# Altium PCB MainBoardPCB_5.PcbDoc (part 12 of 35)
Units mm, origin at the board's own origin, x right, y up, seen from the top; angles counter-clockwise.
Board outline 258.95 x 308.86 mm, 16 copper layers (L1, L2 (GND), L3 (Sign), L4 (GND), L5 (Sign), L6 (PWR/GND), L7(PWR/GND), L8 (Plane_GND), L9 (PWR/GND), L10 (PWR/GND), L11 (PWR/GND), L12 (Sign), L13 (GND), L14 (Sign), L15 (GND), L16), stack 2.502 mm thick; 2361 components, 1769 nets, 8410 pads, 3285 vias.
Unrouted connection lines stored in the file: 4635.
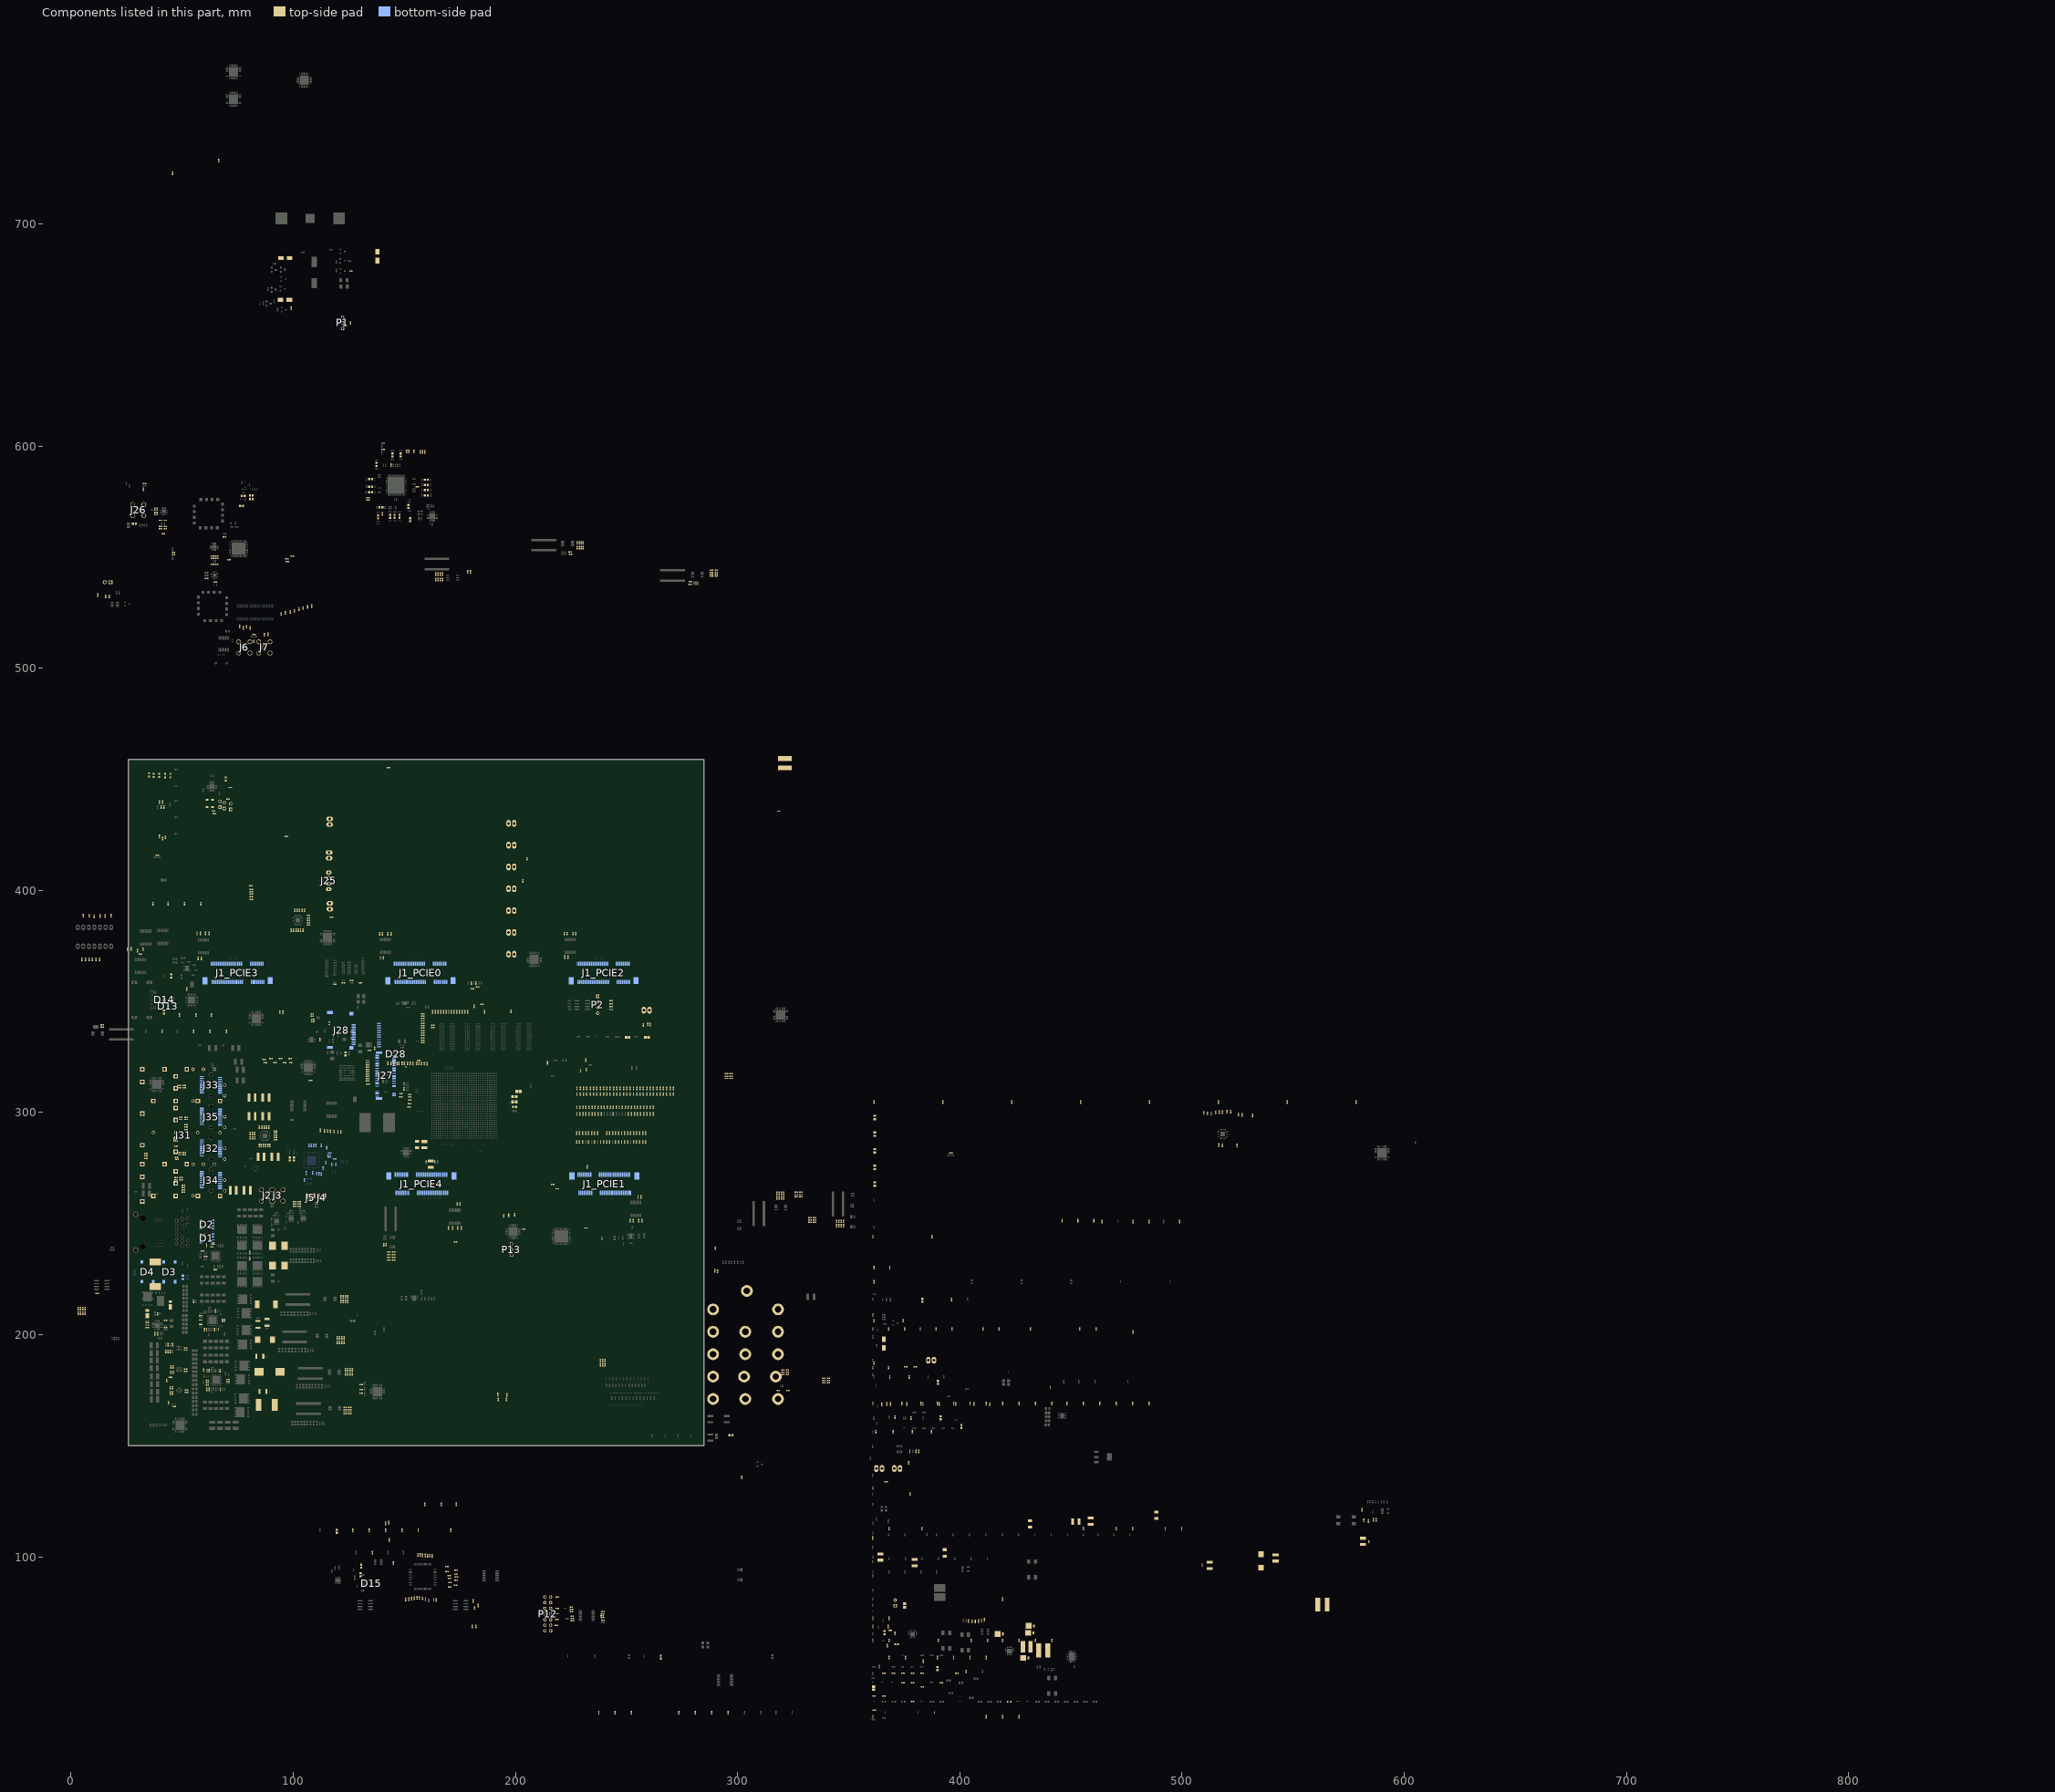
[diagram p20: the components of this part, seen from the top]

## Part data (continued)
FB26 FB27 FB31 FB32 FB43 FB44: library part Ferrite, "FERRITE BEAD 220 OHM 0603 1LN", Case/Package=0603, Case Code (Metric)=1608, Current Rating=2.5A, DC Resistance (DCR)=40mR, Manufacturer=Murata, Manufacturer Part Number=BLM18SG221TN1D, Max Operating Temperature=125°C, Min Operating Temperature=-55°C, Package Quantity=1, Supplier Part Number 1=490-5225-1-ND, Test Frequency=100MHz, Tolerance=25%, Case Code (Imperial)=0603, Category=Inductors, ComponentLink1Description=https://datasheet.ciiva.com/1561/c31e-1561456.pdf?src-supplier=Newark, ComponentLink1URL=https://datasheet.ciiva.com/1561/c31e-1561456.pdf?src-supplier=Newark, ComponentLink2Description=https://datasheet.ciiva.com/41449/001171724-da-01-en-chip-drossel0603-220r-2500ma-1-6x0-8mm-41449352.pdf?src-supplier=Conrad, ComponentLink2URL=https://datasheet.ciiva.com/41449/001171724-da-01-en-chip-drossel0603-220r-2500ma-1-6x0-8mm-41449352.pdf?src-supplier=Conrad, ComponentLink3Description=https://datasheet.ciiva.com/41449/001172313-da-01-en-drossel-0603-220r-21-6x0-8mm-10000st-41449677.pdf?src-supplier=Conrad, ComponentLink3URL=https://datasheet.ciiva.com/41449/001172313-da-01-en-drossel-0603-220r-21-6x0-8mm-10000st-41449677.pdf?src-supplier=Conrad, ComponentLink4Description=https://datasheet.ciiva.com/1012/l0110s0100blm18s-1012626.pdf?src-supplier=Digi-Key, ComponentLink4URL=https://datasheet.ciiva.com/1012/l0110s0100blm18s-1012626.pdf?src-supplier=Digi-Key, ComponentLink5Description=https://datasheet.ciiva.com/1012/l0110s0100blm18s-1012627.pdf?src-supplier=Digi-Key, ComponentLink5URL=https://datasheet.ciiva.com/1012/l0110s0100blm18s-1012627.pdf?src-supplier=Digi-Key, ComponentLink6Description=https://datasheet.ciiva.com/1012/l0110s0100blm18s-1012628.pdf?src-supplier=Digi-Key, ComponentLink6URL=https://datasheet.ciiva.com/1012/l0110s0100blm18s-1012628.pdf?src-supplier=Digi-Key, ComponentLink7Description=https://datasheet.ciiva.com/17279/l0110s0100blm18s-17279573.pdf?src-supplier=Avnet+Europe, ComponentLink7URL=https://datasheet.ciiva.com/17279/l0110s0100blm18s-17279573.pdf?src-supplier=Avnet+Europe, ComponentLink8Description=https://datasheet.ciiva.com/8508/l0110s0100blm18s-8508310.pdf?src-supplier=Avnet, ComponentLink8URL=https://datasheet.ciiva.com/8508/l0110s0100blm18s-8508310.pdf?src-supplier=Avnet, ComponentLink9Description=https://datasheet.ciiva.com/8021/5151-8021517.pdf?src-supplier=Element14, ComponentLink9URL=https://datasheet.ciiva.com/8021/5151-8021517.pdf?src-supplier=Element14, ComponentLink10Description=https://datasheet.ciiva.com/16204/l0110s0100blm18s-16204029.pdf?src-supplier=Future+Electronics, ComponentLink10URL=https://datasheet.ciiva.com/16204/l0110s0100blm18s-16204029.pdf?src-supplier=Future+Electronics, ComponentLink11Description=https://datasheet.ciiva.com/14122/blm-series-eng-tds-14122910.pdf?src-supplier=Distrelec, ComponentLink11URL=https://datasheet.ciiva.com/14122/blm-series-eng-tds-14122910.pdf?src-supplier=Distrelec, ComponentLink12Description=https://datasheet.ciiva.com/8021/5151-8021519.pdf?src-supplier=Element14, ComponentLink12URL=https://datasheet.ciiva.com/8021/5151-8021519.pdf?src-supplier=Element14, Core Material=Ferrite, DC Current=2.5A, Depth=0.95mm, Height=0.8mm, Impedance=220R, Lead Free="Lead Free", Length=1.6mm, Material=Ferrite,Steel, Max Current Rating=2.5A, Max DC Current=2.5A, Number of Circuits=1, Number of Lines=1, Number of Pins=2, Packaging="Tape and Reel", Pricing 1="1=0,14000, 10=0,11600, 25=0,09040, 50=0,07500, 100=0,06460, 250=0,05172, 500=0,04654, 1000=0,03878, 5000=0,03619 (USD)", Radiation Hardening=No, REACH SVHC="No SVHC", RoHS=Yes, Stock 1=123623, Supplier 1=Digi-Key, Termination=SMD/SMT, Weight=7.1E-05oz, Width=0.8mm
FB28 FB29: library part Ferrite, "FERRITE BEAD 220 OHM 0603 1LN", Case/Package=0603, Case Code (Metric)=1608, DC Resistance (DCR)=50mR, Manufacturer=TDK, Manufacturer Part Number=MPZ1608S221ATD25, Max Current Rating=2.2A, Max Operating Temperature=125°C, Min Operating Temperature=-55°C, Package Quantity=4000, Ratings=AEC-Q200, Supplier Part Number 1=445-172893-1-ND, Test Frequency=100MHz, Tolerance=25%, Case Code (Imperial)=0603, Category="Ferrite Beads and Chips", ComponentLink1Description=http://www.mouser.com/ds/2/400/eads_commercial_power_mpz1608_en-923650.pdf?src-supplier=Mouser, ComponentLink1URL=http://www.mouser.com/ds/2/400/eads_commercial_power_mpz1608_en-923650.pdf?src-supplier=Mouser, ComponentLink2Description=https://product.tdk.com/info/en/catalog/datasheets/beads_automotive_power_mpz1608_en.pdf?src-supplier=Digi-Key, ComponentLink2URL=https://product.tdk.com/info/en/catalog/datasheets/beads_automotive_power_mpz1608_en.pdf?src-supplier=Digi-Key, ComponentLink3Description=https://media.digikey.com/pdf/Data%20Sheets/TDK%20PDFs/MPZ_Series_Br.pdf?src-supplier=Digi-Key, ComponentLink3URL=https://media.digikey.com/pdf/Data%20Sheets/TDK%20PDFs/MPZ_Series_Br.pdf?src-supplier=Digi-Key, Height=0.037inch, Impedance=220R, Lead Free="Lead Free", Length=0.063inch, Max DC Current=2.2A, Mount="Surface Mount", Number of Lines=1, Packaging="Tape and Reel", Pricing 1="1=0,11000, 10=0,08600, 25=0,07720, 50=0,05660, 100=0,04890, 250=0,03860, 500=0,03260, 1000=0,02746 (USD)", RoHS=Yes, Stock 1=8766, Supplier 1=Digi-Key, Termination=SMD/SMT, Weight=7.1E-05oz, Width=0.031inch
FB33: library part Ferrite, "Ferrite SMD 2 A 0.05 Ohm, BLM18EG121SN1D, Murata", Case Code (Imperial)=0603, Case Code (Metric)=1608, Current Rating=2A, DC Resistance (DCR)=40mR, Frequency=100MHz, Manufacturer=Murata, Manufacturer Part Number=BLM18EG121SN1D, Max Operating Temperature=125°C, Min Operating Temperature=-55°C, Package Quantity=1, Supplier Part Number 1=490-3991-1-ND, Tolerance=25%, Case/Package=0603, Category=Inductors, ComponentLink1Description=https://datasheet.ciiva.com/34302/1844926-34302803.pdf?src-supplier=Jameco, ComponentLink1URL=https://datasheet.ciiva.com/34302/1844926-34302803.pdf?src-supplier=Jameco, ComponentLink2Description=https://datasheet.ciiva.com/11795/0900766b811b5866-11795397.pdf?src-supplier=RSComponents, ComponentLink2URL=https://datasheet.ciiva.com/11795/0900766b811b5866-11795397.pdf?src-supplier=RSComponents, ComponentLink3Description=https://datasheet.ciiva.com/41449/001171698-da-01-en-chip-drossel0603-120r-2000ma-1-6x0-8mm-41449378.pdf?src-supplier=Conrad, ComponentLink3URL=https://datasheet.ciiva.com/41449/001171698-da-01-en-chip-drossel0603-120r-2000ma-1-6x0-8mm-41449378.pdf?src-supplier=Conrad, ComponentLink4Description=https://datasheet.ciiva.com/41449/001172264-da-01-en-drossel-0603-120r-1-6x0-8mm-4000st-41449582.pdf?src-supplier=Conrad, ComponentLink4URL=https://datasheet.ciiva.com/41449/001172264-da-01-en-drossel-0603-120r-1-6x0-8mm-4000st-41449582.pdf?src-supplier=Conrad, ComponentLink5Description=https://datasheet.ciiva.com/1467/5169-1467155.pdf?src-supplier=Element14, ComponentLink5URL=https://datasheet.ciiva.com/1467/5169-1467155.pdf?src-supplier=Element14, ComponentLink6Description=https://datasheet.ciiva.com/1467/5169-1467156.pdf?src-supplier=Element14, ComponentLink6URL=https://datasheet.ciiva.com/1467/5169-1467156.pdf?src-supplier=Element14, ComponentLink7Description=https://datasheet.ciiva.com/18092/getdatasheetpartid-120977-18092965.pdf?src-supplier=Verical, ComponentLink7URL=https://datasheet.ciiva.com/18092/getdatasheetpartid-120977-18092965.pdf?src-supplier=Verical, ComponentLink8Description=https://datasheet.ciiva.com/6211/l0110s0101blm18e-6211463.pdf?src-supplier=Digi-Key, ComponentLink8URL=https://datasheet.ciiva.com/6211/l0110s0101blm18e-6211463.pdf?src-supplier=Digi-Key, ComponentLink9Description=https://datasheet.ciiva.com/16387/l0110s0101blm18e-16387655.pdf?src-supplier=Future+Electronics, ComponentLink9URL=https://datasheet.ciiva.com/16387/l0110s0101blm18e-16387655.pdf?src-supplier=Future+Electronics, ComponentLink10Description=https://datasheet.ciiva.com/3081/l0110s0101blm18e-3081624.pdf?src-supplier=Avnet, ComponentLink10URL=https://datasheet.ciiva.com/3081/l0110s0101blm18e-3081624.pdf?src-supplier=Avnet, ComponentLink11Description=https://datasheet.ciiva.com/14122/blm-series-eng-tds-14122904.pdf?src-supplier=Distrelec, ComponentLink11URL=https://datasheet.ciiva.com/14122/blm-series-eng-tds-14122904.pdf?src-supplier=Distrelec, ComponentLink12Description=https://datasheet.ciiva.com/17279/l0110s0101blm18e-17279548.pdf?src-supplier=Avnet+Europe, ComponentLink12URL=https://datasheet.ciiva.com/17279/l0110s0101blm18e-17279548.pdf?src-supplier=Avnet+Europe, Core Material=Ferrite, DC Current=2A, Depth=0.8mm, Height=0.8mm, Impedance=120R, Lead Free="Lead Free", Length=1.6mm, Material=Steel,Ferrite, Max Current Rating=2A, Max DC Current=2A, Military Standard=Not, Number of Circuits=1, Number of Lines=1, Number of Pins=2, Packaging="Tape and Reel", Pricing 1="1=0,23000, 10=0,17500, 25=0,14520, 50=0,12520, 100=0,11260, 250=0,09508, 500=0,08508, 1000=0,07257 (USD)", Radiation Hardening=No, REACH SVHC="No SVHC", RoHS=Yes, Stock 1=29633, Supplier 1=Digi-Key, Termination=SMD/SMT, Test Frequency=100MHz, Weight=7.1E-05oz, Width=0.8mm
FB34: library part Ferrite, "Ferrite Beads Power Chip 330Ohm 25% 100MHz 800mA 210mOhm DCR 0603 Automotive T/R", Case Code (Imperial)=0603, Case Code (Metric)=1608, DC Resistance (DCR)=210mR, Frequency=100MHz, Manufacturer="Taiyo Yuden", Manufacturer Part Number=FBMH1608HL331-T, Max Current Rating=800mA, Max DC Current=600mA, Max Operating Temperature=125°C, Min Operating Temperature=-40°C, Package Quantity=1, Supplier Part Number 1=587-1734-1-ND, Tolerance=25%, Case/Package=0603, Category="Ferrite Beads and Chips", ComponentLink1Description=https://datasheet.ciiva.com/1012/fbmh1608hl331-t-ss-1012496.pdf?src-supplier=Digi-Key, ComponentLink1URL=https://datasheet.ciiva.com/1012/fbmh1608hl331-t-ss-1012496.pdf?src-supplier=Digi-Key, ComponentLink2Description=https://datasheet.ciiva.com/25614/0900766b810b37be-25614404.pdf?src-supplier=RSComponents, ComponentLink2URL=https://datasheet.ciiva.com/25614/0900766b810b37be-25614404.pdf?src-supplier=RSComponents, ComponentLink3Description=https://datasheet.ciiva.com/1012/chipbeads01-e-1012495.pdf?src-supplier=Digi-Key, ComponentLink3URL=https://datasheet.ciiva.com/1012/chipbeads01-e-1012495.pdf?src-supplier=Digi-Key, ComponentLink4Description=https://datasheet.ciiva.com/1012/chipbeads01-e-1012494.pdf?src-supplier=Digi-Key, ComponentLink4URL=https://datasheet.ciiva.com/1012/chipbeads01-e-1012494.pdf?src-supplier=Digi-Key, Composition="Ferrite Bead", Core Material=Ferrite, Depth=0.95mm, Halogen Free="Halogen Free", Height=0.8mm, Impedance=330R, Lead Free="Lead Free", Length=1.6mm, Material=Ferrite, Mount="Surface Mount", Number of Lines=1, Number of Pins=2, Packaging="Tape and Reel", Pricing 1="1=0,11000, 10=0,09400, 25=0,07320, 50=0,06060, 100=0,05230, 250=0,04180, 500=0,03762, 1000=0,03135 (USD)", RoHS=Yes, Shielding=Unshielded, Stock 1=4788, Supplier 1=Digi-Key, Termination=SMD/SMT, Test Frequency=100MHz, Width=0.031inch
FB38 FB39 FB40 FB41: library part Ferrite, "FERRITE BEAD 600 OHM 0805 1LN", Case Code (Imperial)=0805, Case Code (Metric)=2012, Current Rating=500mA, DC Resistance (DCR)=300mR, Frequency=100MHz, Manufacturer=Laird, Manufacturer Part Number=HZ0805E601R-10, Max Operating Temperature=125°C, Min Operating Temperature=-40°C, Package Quantity=1, Supplier Part Number 1=240-2399-1-ND, Case/Package=0805, Category="Fixed Inductors", ComponentLink1Description=https://datasheet.ciiva.com/22622/1685710-22622833.pdf?src-supplier=Element14, ComponentLink1URL=https://datasheet.ciiva.com/22622/1685710-22622833.pdf?src-supplier=Element14, ComponentLink2Description=https://datasheet.ciiva.com/1013/hz0805e601r-10-1013170.pdf?src-supplier=Digi-Key, ComponentLink2URL=https://datasheet.ciiva.com/1013/hz0805e601r-10-1013170.pdf?src-supplier=Digi-Key, ComponentLink3Description=https://datasheet.ciiva.com/8512/hz0805e601r-10-a-vp-8512772.pdf?src-supplier=Avnet, ComponentLink3URL=https://datasheet.ciiva.com/8512/hz0805e601r-10-a-vp-8512772.pdf?src-supplier=Avnet, ComponentLink4Description=https://datasheet.ciiva.com/16714/70065439-16714006.pdf?src-supplier=Allied+Electronics, ComponentLink4URL=https://datasheet.ciiva.com/16714/70065439-16714006.pdf?src-supplier=Allied+Electronics, Contact Plating=Tin,Matte, Core Material=Ferrite, Depth=1.45mm, Height=1.25mm, Impedance=600R, Lead Free="Lead Free", Length=2mm, Material=Ferrite, Max Current Rating=500mA, Max DC Current=500mA, Mount="Surface Mount", Number of Lines=1, Packaging="Tape and Reel", Pricing 1="1=0,18000, 10=0,14400, 25=0,11200, 50=0,09280, 100=0,07990, 250=0,06396, 500=0,05754, 1000=0,04796 (USD)", REACH SVHC=Unknown, RoHS=Yes, Stock 1=2783878, Supplier 1=Digi-Key, Termination=SMD/SMT, Test Frequency=100MHz, Weight=0.00392oz, Width=0.049inch
FB42: library part Ferrite, "Ind Chip Bead 120Ohm 25% 100MHz Ferrite 3A 0603 Paper T/R", Case Code (Imperial)=0603, Case Code (Metric)=1608, Current Rating=3A, DC Resistance (DCR)=25mR, Frequency=100MHz, Manufacturer=Murata, Manufacturer Part Number=BLM18SG121TN1D, Max Operating Temperature=125°C, Min Operating Temperature=-55°C, Package Quantity=1, Supplier Part Number 1=1515752, Tolerance=25%, Case/Package=0603, Category="Ferrite Beads and Chips", ComponentLink1Description=https://datasheet.ciiva.com/1012/l0110s0100blm18s-1012624.pdf?src-supplier=Digi-Key, ComponentLink1URL=https://datasheet.ciiva.com/1012/l0110s0100blm18s-1012624.pdf?src-supplier=Digi-Key, ComponentLink2Description=https://datasheet.ciiva.com/18093/getdatasheetpartid-295885-18093249.pdf?src-supplier=Verical, ComponentLink2URL=https://datasheet.ciiva.com/18093/getdatasheetpartid-295885-18093249.pdf?src-supplier=Verical, ComponentLink3Description=https://datasheet.ciiva.com/11799/0900766b811b5866-11799181.pdf?src-supplier=RSComponents, ComponentLink3URL=https://datasheet.ciiva.com/11799/0900766b811b5866-11799181.pdf?src-supplier=RSComponents, ComponentLink4Description=https://datasheet.ciiva.com/41449/001171723-da-01-en-chip-drossel0603-120r-3000ma-1-6x0-8mm-41449353.pdf?src-supplier=Conrad, ComponentLink4URL=https://datasheet.ciiva.com/41449/001171723-da-01-en-chip-drossel0603-120r-3000ma-1-6x0-8mm-41449353.pdf?src-supplier=Conrad, ComponentLink5Description=https://datasheet.ciiva.com/41449/001172312-da-01-en-drossel-0603-120r-1-6x0-8mm-10000st-41449675.pdf?src-supplier=Conrad, ComponentLink5URL=https://datasheet.ciiva.com/41449/001172312-da-01-en-drossel-0603-120r-1-6x0-8mm-10000st-41449675.pdf?src-supplier=Conrad, ComponentLink6Description=https://datasheet.ciiva.com/1012/l0110s0100blm18s-1012625.pdf?src-supplier=Digi-Key, ComponentLink6URL=https://datasheet.ciiva.com/1012/l0110s0100blm18s-1012625.pdf?src-supplier=Digi-Key, ComponentLink7Description=https://datasheet.ciiva.com/8021/5151-8021511.pdf?src-supplier=Element14, ComponentLink7URL=https://datasheet.ciiva.com/8021/5151-8021511.pdf?src-supplier=Element14, ComponentLink8Description=https://datasheet.ciiva.com/8021/5151-8021512.pdf?src-supplier=Element14, ComponentLink8URL=https://datasheet.ciiva.com/8021/5151-8021512.pdf?src-supplier=Element14, ComponentLink9Description=https://datasheet.ciiva.com/14122/blm-series-eng-tds-14122906.pdf?src-supplier=Distrelec, ComponentLink9URL=https://datasheet.ciiva.com/14122/blm-series-eng-tds-14122906.pdf?src-supplier=Distrelec, ComponentLink10Description=https://datasheet.ciiva.com/16395/l0110s0100blm18s-16395498.pdf?src-supplier=Future+Electronics, ComponentLink10URL=https://datasheet.ciiva.com/16395/l0110s0100blm18s-16395498.pdf?src-supplier=Future+Electronics, ComponentLink11Description=https://datasheet.ciiva.com/1012/l0110s0100blm18s-1012623.pdf?src-supplier=Digi-Key, ComponentLink11URL=https://datasheet.ciiva.com/1012/l0110s0100blm18s-1012623.pdf?src-supplier=Digi-Key, ComponentLink12Description=https://datasheet.ciiva.com/17246/l0110s0100blm18s-17246943.pdf?src-supplier=Avnet+Europe, ComponentLink12URL=https://datasheet.ciiva.com/17246/l0110s0100blm18s-17246943.pdf?src-supplier=Avnet+Europe, Core Material=Ferrite, Depth=0.8mm, Height=0.8mm, Impedance=120R, Lead Free="Lead Free", Length=1.6mm, Material=Steel,Ferrite, Max Current Rating=3A, Max DC Current=3A, Number of Circuits=1, Number of Lines=1, Number of Pins=2, Packaging="Tape and Reel", REACH SVHC="No SVHC", RoHS=Yes, Shielding=Unshielded, Stock 1=47191, Supplier 1=Farnell, Termination=SMD/SMT, Test Frequency=100MHz, Width=0.8mm
FB45: library part Ferrite, "Ferrite SMD 2 A 0.05 Ohm, BLM18EG121SN1D, Murata", Case/Package=0603, Case Code (Metric)=1608, Current Rating=2A, DC Resistance (DCR)=40mR, Frequency=100MHz, Manufacturer=Murata, Manufacturer Part Number=BLM18EG121SN1D, Max Operating Temperature=125°C, Min Operating Temperature=-55°C, Package Quantity=1, Supplier Part Number 1=490-3991-1-ND, Tolerance=25%, Case Code (Imperial)=0603, Category=Inductors, ComponentLink1Description=https://datasheet.ciiva.com/34302/1844926-34302803.pdf?src-supplier=Jameco, ComponentLink1URL=https://datasheet.ciiva.com/34302/1844926-34302803.pdf?src-supplier=Jameco, ComponentLink2Description=https://datasheet.ciiva.com/11795/0900766b811b5866-11795397.pdf?src-supplier=RSComponents, ComponentLink2URL=https://datasheet.ciiva.com/11795/0900766b811b5866-11795397.pdf?src-supplier=RSComponents, ComponentLink3Description=https://datasheet.ciiva.com/41449/001171698-da-01-en-chip-drossel0603-120r-2000ma-1-6x0-8mm-41449378.pdf?src-supplier=Conrad, ComponentLink3URL=https://datasheet.ciiva.com/41449/001171698-da-01-en-chip-drossel0603-120r-2000ma-1-6x0-8mm-41449378.pdf?src-supplier=Conrad, ComponentLink4Description=https://datasheet.ciiva.com/41449/001172264-da-01-en-drossel-0603-120r-1-6x0-8mm-4000st-41449582.pdf?src-supplier=Conrad, ComponentLink4URL=https://datasheet.ciiva.com/41449/001172264-da-01-en-drossel-0603-120r-1-6x0-8mm-4000st-41449582.pdf?src-supplier=Conrad, ComponentLink5Description=https://datasheet.ciiva.com/1467/5169-1467155.pdf?src-supplier=Element14, ComponentLink5URL=https://datasheet.ciiva.com/1467/5169-1467155.pdf?src-supplier=Element14, ComponentLink6Description=https://datasheet.ciiva.com/1467/5169-1467156.pdf?src-supplier=Element14, ComponentLink6URL=https://datasheet.ciiva.com/1467/5169-1467156.pdf?src-supplier=Element14, ComponentLink7Description=https://datasheet.ciiva.com/18092/getdatasheetpartid-120977-18092965.pdf?src-supplier=Verical, ComponentLink7URL=https://datasheet.ciiva.com/18092/getdatasheetpartid-120977-18092965.pdf?src-supplier=Verical, ComponentLink8Description=https://datasheet.ciiva.com/6211/l0110s0101blm18e-6211463.pdf?src-supplier=Digi-Key, ComponentLink8URL=https://datasheet.ciiva.com/6211/l0110s0101blm18e-6211463.pdf?src-supplier=Digi-Key, ComponentLink9Description=https://datasheet.ciiva.com/16387/l0110s0101blm18e-16387655.pdf?src-supplier=Future+Electronics, ComponentLink9URL=https://datasheet.ciiva.com/16387/l0110s0101blm18e-16387655.pdf?src-supplier=Future+Electronics, ComponentLink10Description=https://datasheet.ciiva.com/3081/l0110s0101blm18e-3081624.pdf?src-supplier=Avnet, ComponentLink10URL=https://datasheet.ciiva.com/3081/l0110s0101blm18e-3081624.pdf?src-supplier=Avnet, ComponentLink11Description=https://datasheet.ciiva.com/14122/blm-series-eng-tds-14122904.pdf?src-supplier=Distrelec, ComponentLink11URL=https://datasheet.ciiva.com/14122/blm-series-eng-tds-14122904.pdf?src-supplier=Distrelec, ComponentLink12Description=https://datasheet.ciiva.com/17279/l0110s0101blm18e-17279548.pdf?src-supplier=Avnet+Europe, ComponentLink12URL=https://datasheet.ciiva.com/17279/l0110s0101blm18e-17279548.pdf?src-supplier=Avnet+Europe, Core Material=Ferrite, DC Current=2A, Depth=0.8mm, Height=0.8mm, Impedance=120R, Lead Free="Lead Free", Length=1.6mm, Material=Steel,Ferrite, Max Current Rating=2A, Max DC Current=2A, Military Standard=Not, Number of Circuits=1, Number of Lines=1, Number of Pins=2, Packaging="Tape and Reel", Pricing 1="1=0,23000, 10=0,17500, 25=0,14520, 50=0,12520, 100=0,11260, 250=0,09508, 500=0,08508, 1000=0,07257 (USD)", Radiation Hardening=No, REACH SVHC="No SVHC", RoHS=Yes, Stock 1=29633, Supplier 1=Digi-Key, Termination=SMD/SMT, Test Frequency=100MHz, Weight=7.1E-05oz, Width=0.8mm
J1_PCIE0 J1_PCIE1 J1_PCIE2 J1_PCIE3 J1_PCIE4: "PCI Express / PCI Connectors Mini PCI-E 6.8H G/F", Flammability Rating="UL94 V-0", High Temperature Housing=Yes, Housing Color=Black, Manufacturer="TE Connectivity AMP", Max Operating Temperature=85°C, Min Operating Temperature=-55°C, Package Quantity=450, Supplier Part Number 1=A125147CT-ND, Category="Card Edge Connectors", ComponentLink1Description=https://www.mouser.com/ds/2/418/NG_DS_8-1773459-7_EXPRESS_MINI_CARD_QRG_0816-907003.pdf?src-supplier=Mouser, ComponentLink1URL=https://www.mouser.com/ds/2/418/NG_DS_8-1773459-7_EXPRESS_MINI_CARD_QRG_0816-907003.pdf?src-supplier=Mouser, ComponentLink2Description=https://www.te.com/commerce/DocumentDelivery/DDEController?Action=srchrtrv&DocNm=108-99102&DocType=SS&DocLang=EN&src-supplier=Digi-Key, ComponentLink2URL=https://www.te.com/commerce/DocumentDelivery/DDEController?Action=srchrtrv&DocNm=108-99102&DocType=SS&DocLang=EN&src-supplier=Digi-Key, ComponentLink3Description=https://www.te.com/commerce/DocumentDelivery/DDEController?Action=srchrtrv&amp;DocNm=2041262&amp;DocType=Customer+Drawing&amp;DocLang=English&src-supplier=Digi-Key, ComponentLink3URL=https://www.te.com/commerce/DocumentDelivery/DDEController?Action=srchrtrv&amp;DocNm=2041262&amp;DocType=Customer+Drawing&amp;DocLang=English&src-supplier=Digi-Key, ComponentLink4Description=http://www.te.com/commerce/DocumentDelivery/DDEController?Action=srchrtrv&DocNm=2041262&DocType=Customer+Drawing&DocLang=English&src-supplier=Digi-Key, ComponentLink4URL=http://www.te.com/commerce/DocumentDelivery/DDEController?Action=srchrtrv&DocNm=2041262&DocType=Customer+Drawing&DocLang=English&src-supplier=Digi-Key, ComponentLink5Description=http://www.te.com/commerce/DocumentDelivery/DDEController?Action=showdoc&DocId=Customer+Drawing%7F2041262%7FC%7Fpdf%7FEnglish%7FENG_CD_2041262_C.pdf&src-supplier=Avnet, ComponentLink5URL=http://www.te.com/commerce/DocumentDelivery/DDEController?Action=showdoc&DocId=Customer+Drawing%7F2041262%7FC%7Fpdf%7FEnglish%7FENG_CD_2041262_C.pdf&src-supplier=Avnet, Connector Type=Receptacle, Contact Material="Copper Alloy", Contact Plating=Gold, ELV=Compliant, Housing Material=Thermoplastic, Lead Free="Lead Free", Manufacturer Part Number=2041262-1, Mount="Surface Mount", Number of Contacts=52, Number of Pins=52, Number of Positions=52, Number of Rows=2, Orientation="Right Angle", Packaging="Tape and Reel", PCB Mounting Orientation=Horizontal, PCB Mount Retention=Without, Pitch=0.8mm, Pricing 1="1=1,04000, 10=0,91200, 25=0,85840, 50=0,82260, 100=0,78680 (USD)", RoHS=Yes, Row Spacing=0.031inch, Stackable=No, Stack Height=0.268inch, Stock 1=33744, Supplier 1=Digi-Key, Termination=Solder
J2 J3 J6 J7 J26: "SMA Connector, Pitch 5.08 mm, 1 Position, Height 9.5 mm, Tail Length 4 mm, -65 to 165 degC, RoHS, Bulk", Frequency Max=3GHz, Supplier Part Number 1=78M7270, Coaxial Cable Types=-, Coaxial Termination=Solder, ComponentLink1Description="Manufacturer URL", ComponentLink1URL=http://www.te.com, ComponentLink2Description=Datasheet, ComponentLink2URL=http://www.onlinecomponents.com/productFiles/mf-AMP/eng_cd_1814832_a.pdf, Connector Body Style="Straight Jack", Connector Mounting="PCB Mount", Connector Type="SMA Coaxial", Contact Material="Beryllium Copper", Contact Plating="Gold Plated Contacts", DatasheetVersion="Rev. B1", Impedance=50ohm, Mounting Technology="Through Hole", PackageDescription="SMA Connector, Pitch 5.08 mm, 1 Position, Height 9.5 mm, Tail Length 4 mm", PackageReference=THD, Product Range="ZDC Series", Supplier 1=Newark, Supplier 2=Newark, Supplier 3=Farnell, Supplier 4=Digi-Key, Supplier Part Number 2=13M4002, Supplier Part Number 3=1248990, Supplier Part Number 4=A97594-ND, SVHC="No SVHC (15-Jun-2015)"
J4 J5: "Ultra Miniature Coaxial Connector Jack, 60 V, 50 Ohm, -40 to 90 degC, RoHS, Tape and Reel", Maximum Frequency="6 GHz", Operating Temperature Range="- 40 C to + 90 C", Supplier Part Number 1=62X0488, Body Material="Liquid Crystal Polymer (LCP)", Brand="TE Connectivity / AMP", ComponentLink1Description="Manufacturer URL", ComponentLink1URL=http://www.te.com, ComponentLink2Description=Datasheet, ComponentLink2URL=http://www.te.com/commerce/DocumentDelivery/DDEController?Action=srchrtrv&DocNm=1909763&DocType=Customer+Drawing&DocLang=English, Contact Material="Copper Alloy", Contact Plating=Gold, DatasheetVersion="Rev. B2", Factory Pack Quantity=5000, Gender="Jack (Female)", Impedance="50 Ohms", Mounting Technology="Surface Mount", Orientation=Straight, PackageDescription="3-Pin Surface Mount Device, Body 2.6 x 2.6 mm", PackageReference=SMD, Packaging=Reel, Product=Connectors, Product Category="RF Connectors / Coaxial Connectors", RF Series=UMCC, RoHS=Details, Supplier 1=Newark, Supplier 2=Farnell, Supplier 3=Digi-Key, Supplier 4=Digi-Key, Supplier 5=Digi-Key, Supplier Part Number 2=2781689, Supplier Part Number 3=A118077TR-ND, Supplier Part Number 4=A118077CT-ND, Supplier Part Number 5=A118077DKR-ND
J12 J13 J15 J16 J17 J19 J20 J21 J22 J23 J24 J29 J30 J36: library part "2 Pin"
J25: library part "4 Pin"
J27: library part 1-2199230-6_CHINA, "CONN EDGE DUAL FMALE 67POS 0.020", Contact Current Rating=500mA, Housing Color=Black, Manufacturer 1="TE Connectivity", Manufacturer Part Number 1=1-2199230-6, Package Quantity=1, Supplier Part Number 1=A118046CT-ND, ComponentLink1Description=https://datasheet.ciiva.com/29349/eng-cd-2199230-b1-c-2199230-b1-29349141.pdf?src-supplier=Digi-Key, ComponentLink1URL=https://datasheet.ciiva.com/29349/eng-cd-2199230-b1-c-2199230-b1-29349141.pdf?src-supplier=Digi-Key, Contact Material="Copper Alloy", Contact Plating=Gold,Matte, ELV=Compliant, Height=0.165inch, Housing Material=Thermoplastic, Length=0.862inch, Mount="Surface Mount", Number of Positions=67, Number of Rows=2, Orientation="Right Angle", Packaging="Tape and Reel", PCB Mounting Orientation="Right Angle", Pitch=0.5mm, Pricing 1="1=1,59000, 10=1,43900, 25=1,35120, 50=1,29220, 100=1,23350, 250=1,11608, 500=1,02796 (USD)", RoHS=Yes, Stock 1=3265, Supplier 1=Digi-Key, Width=8.7mm
J28: "WR-CRD Micro SD Card Connector Push & Push", Contact Resistance=100mOhm, Operating Temperature="-40 to +85degC", Rated Current=0.5A, Withstanding Voltage=500VAC, Working Voltage=30VAC, ComponentLink1Description=Manufacturer, ComponentLink1URL=http://www.we-online.de, ComponentLink2Description=Datasheet, ComponentLink2URL=https://katalog.we-online.com/em/datasheet/693071020811.pdf, Gender=Socket, Mounting Technology=SMT, Packaging="Tape and Reel", Part Number=693071020811, Pin Number=8, Published Date="November 2019", Publisher="Wurth Elektronik", Type="Push & Push"
J31: library part 2007132, Flammability Rating="UL94 V-0", Manufacturer="TE Connectivity", Manufacturer Part Number=2007132-1, Package Quantity=16, Supplier Part Number 1=A97939-ND, ComponentLink1Description=https://datasheet.ciiva.com/8074/1702641-8074723.pdf?src-supplier=Element14, ComponentLink1URL=https://datasheet.ciiva.com/8074/1702641-8074723.pdf?src-supplier=Element14, ComponentLink2Description=https://datasheet.ciiva.com/16354/2007132-1-16354359.pdf?src-supplier=Future+Electronics, ComponentLink2URL=https://datasheet.ciiva.com/16354/2007132-1-16354359.pdf?src-supplier=Future+Electronics, ComponentLink3Description=https://datasheet.ciiva.com/1447/1744756-1447853.pdf?src-supplier=Newark, ComponentLink3URL=https://datasheet.ciiva.com/1447/1744756-1447853.pdf?src-supplier=Newark, ComponentLink4Description=https://datasheet.ciiva.com/689/eng-cd-2007132-d1-pdf-2007132-c-drw-689518.pdf?src-supplier=Digi-Key, ComponentLink4URL=https://datasheet.ciiva.com/689/eng-cd-2007132-d1-pdf-2007132-c-drw-689518.pdf?src-supplier=Digi-Key, ComponentLink5Description=https://datasheet.ciiva.com/3093/eng-cs-1773408-1-pluggable-ixo-solutions-sfp2b-0209-3093041.pdf?src-supplier=Avnet, ComponentLink5URL=https://datasheet.ciiva.com/3093/eng-cs-1773408-1-pluggable-ixo-solutions-sfp2b-0209-3093041.pdf?src-supplier=Avnet, ComponentLink6Description=https://datasheet.ciiva.com/30089/o-solut-30089223.pdf?src-supplier=Onlinecomponents.com, ComponentLink6URL=https://datasheet.ciiva.com/30089/o-solut-30089223.pdf?src-supplier=Onlinecomponents.com, ComponentLink7Description=https://datasheet.ciiva.com/16775/eng-cs-1773408-1-pluggable-ixo-solutions-sfp2b-0209-16775672.pdf?src-supplier=Avnet+Europe, ComponentLink7URL=https://datasheet.ciiva.com/16775/eng-cs-1773408-1-pluggable-ixo-solutions-sfp2b-0209-16775672.pdf?src-supplier=Avnet+Europe, Connector Type=SFP, Data Rate=16Gbps, Depth=47.8mm, ELV=Compliant, Features=Shielded, Gender=Female, Housing Material=Silver, Lead Free="Not Applicable", Length=57.25mm, Material=Silver, Mount="Through Hole", Number of Ports=4, Orientation="Right Angle", Packaging=Tray, PCB Thickness=2.25mm, Pricing 1="1 = 12,92000, 10 = 11,74600, 25 = 11,45240, 50 = 10,57140, 100 = 9,98410, 250 = 9,10312, 500 = 8,51582, 1000 = 7,81106 (USD)", Radiation Hardening=No, REACH SVHC="No SVHC", RoHS=Yes, Stock 1=509, Supplier 1=Digi-Key, Tail Length=2.05mm, Termination=Press-Fit
J32 J33 J34 J35: "Conn zSFP+ F 20 POS 0.8mm Solder RA SMD 20 Terminal 1 Port zSFP+™ Reel", Current Rating=500mA, Flammability Rating="UL94 V-0", Housing Color=Black, Manufacturer=Molex, Max Operating Temperature=85°C, Max Voltage Rating (AC)=120V, Min Operating Temperature=-40°C, Package Quantity=960, Supplier Part Number 1=WM6178CT-ND, Category=Connectors, ComponentLink1Description=https://datasheet.ciiva.com/3966/317371703820001-io-nectors-3966818.pdf?src-supplier=Arrow, ComponentLink1URL=https://datasheet.ciiva.com/3966/317371703820001-io-nectors-3966818.pdf?src-supplier=Arrow, ComponentLink2Description=https://datasheet.ciiva.com/26288/495951703820001-io-nectors-26288395.pdf?src-supplier=Onlinecomponents.com, ComponentLink2URL=https://datasheet.ciiva.com/26288/495951703820001-io-nectors-26288395.pdf?src-supplier=Onlinecomponents.com, ComponentLink3Description=https://datasheet.ciiva.com/26945/getdatasheetpartid-750999-26945324.pdf?src-supplier=Verical, ComponentLink3URL=https://datasheet.ciiva.com/26945/getdatasheetpartid-750999-26945324.pdf?src-supplier=Verical, ComponentLink4Description=https://datasheet.ciiva.com/16077/629941703820001-io-nectors-16077135.pdf?src-supplier=Onlinecomponents.com, ComponentLink4URL=https://datasheet.ciiva.com/16077/629941703820001-io-nectors-16077135.pdf?src-supplier=Onlinecomponents.com, ComponentLink5Description=https://datasheet.ciiva.com/6929/1703820001-sd-6929267.pdf?src-supplier=Digi-Key, ComponentLink5URL=https://datasheet.ciiva.com/6929/1703820001-sd-6929267.pdf?src-supplier=Digi-Key, ComponentLink6Description=https://datasheet.ciiva.com/26915/getdatasheetpartid-410263-26915957.pdf?src-supplier=Verical, ComponentLink6URL=https://datasheet.ciiva.com/26915/getdatasheetpartid-410263-26915957.pdf?src-supplier=Verical, ComponentLink7Description=https://datasheet.ciiva.com/3138/1703820001-io-connectors-3138921.pdf?src-supplier=Avnet, ComponentLink7URL=https://datasheet.ciiva.com/3138/1703820001-io-connectors-3138921.pdf?src-supplier=Avnet, ComponentLink8Description=https://datasheet.ciiva.com/3138/1703820001-io-connectors-3138922.pdf?src-supplier=Avnet, ComponentLink8URL=https://datasheet.ciiva.com/3138/1703820001-io-connectors-3138922.pdf?src-supplier=Avnet, ComponentLink9Description=https://datasheet.ciiva.com/4569/1703820001-io-connectors-230609-4569597.pdf?src-supplier=Mouser, ComponentLink9URL=https://datasheet.ciiva.com/4569/1703820001-io-connectors-230609-4569597.pdf?src-supplier=Mouser, Connector Type=Receptacle, Contact Material="Bronze,Brass,Copper Alloy", Contact Plating=Gold, Depth=7.87mm, ELV=Compliant, Gender=Female, Halogen Free="Low Halogen", Housing Material=Polycarbonate, Length=11mm, Manufacturer Part Number=1703820001, Material=Brass, Max Voltage Rating (DC)=120V, Mount="Surface Mount", Number of Circuits=20, Number of Contacts=20, Number of Ports=1, Number of Positions=20, Number of Positions Loaded=20, Orientation="Right Angle", Packaging="Tape and Reel", Pitch=0.8mm, Pricing 1="1=2,23000, 10=2,02500, 25=1,90080, 50=1,81820, 100=1,73550 (USD)", Radiation Hardening=No, REACH SVHC="No SVHC", RoHS=Yes, Stock 1=248, Supplier 1=Digi-Key, Termination=Solder, Voltage Rating (AC)=120V
L1 L2 L3 L4 L5 L6 L7 L8: "Ind Power Shielded Wirewound 4.7uH 20% 100KHz Ferrite 1.7A Embossed T/R", Case/Package=Nonstandard, Current Rating=1.7A, DC Resistance (DCR)=84mR, Inductance=4.7uH, Manufacturer="Taiyo Yuden", Max Operating Temperature=125°C, Min Operating Temperature=-40°C, Package Quantity=3500, Ratings=AEC-Q200, Saturation Current=2A, Self Resonant Frequency=35MHz, Supplier Part Number 1=587-3578-1-ND, Test Frequency=100kHz, Tolerance=20%, Category="Fixed Inductors", ComponentLink1Description=https://datasheet.ciiva.com/29697/nrs4018t4r7mdgjv-ss-29697589.pdf?src-supplier=Digi-Key, ComponentLink1URL=https://datasheet.ciiva.com/29697/nrs4018t4r7mdgjv-ss-29697589.pdf?src-supplier=Digi-Key, Composition=Wirewound, Core Material=Ferrite, Depth=4mm, Halogen Free="Halogen Free", Height=1.8mm, Height - Seated (Max)=0.071inch, Length=4mm, Manufacturer Part Number=NRS4018T4R7MDGJV, Max DC Current=1.7A, Mount="Surface Mount", Packaging="Tape and Reel", Pricing 1="1=0,41000, 10=0,35700, 100=0,25500, 500=0,21422, 1000=0,17342 (USD)", Radiation Hardening=No, RoHS=Yes, Shielding=Shielded, Stock 1=1620, Supplier 1=Digi-Key, Termination=SMD/SMT, Weight=0.003527oz, Width=0.157inch
L9 L10: "220nH Shielded Molded Inductor 25A 1.9mOhm Max Nonstandard", Inductance=220nH@25A, Manufacturer 1=Laird, Supplier Part Number 1=240-3179-1-ND, ComponentLink1Description="Datasheet MGV0605 Series", ComponentLink1URL=https://assets.lairdtech.com/home/brandworld/files/MGV0605%20series%20approve%20sheet.pdf, Manufacturer Part Number 1=MGV0605R22M-10, Pricing 1="1=0,92000, 10=0,85800, 100=0,62020 (USD)", RoHS=No, Stock 1=1560, Supplier 1=Digi-Key
L11: "1.2µH Shielded Molded Inductor 17A 3.8mOhm Max Nonstandard", Inductance=1.2uH@17A, Manufacturer 1=Laird, Supplier Part Number 1=240-3187-1-ND, ComponentLink1Description="MGV1004 Series", ComponentLink1URL=https://assets.lairdtech.com/home/brandworld/files/MGV1004%20series%20approve%20sheet.pdf, Manufacturer Part Number 1=MGV10041R2M-10, Pricing 1="1=1,46000, 10=1,35700, 100=0,98140 (USD)", RoHS=No, Stock 1=1781, Supplier 1=Digi-Key
L12: "Wurth WE-LHMI Series Shielded Wire-wound SMD Inductor with a Iron Core, 0.68 µH Moulded 14A Idc", Case/Package=Nonstandard, Current Rating=14A, DC Resistance (DCR)=3.99mR, Inductance=680nH, Manufacturer 1="Wurth Electronics", Max Operating Temperature=125°C, Min Operating Temperature=-40°C, Saturation Current=32.5A, Self Resonant Frequency=53MHz, Supplier Part Number 1=732-7217-1-ND, Test Frequency=100kHz, Tolerance=20%, ComponentLink1Description=Datasheet, ComponentLink1URL=https://www.we-online.de/katalog/datasheet/744373560068.pdf, Composition=Wirewound, Core Material=Ferrite, Height - Seated (Max)=0.118inch, Length=0.362inch, Manufacturer Part Number 1=744373560068, Mount="Surface Mount", Packaging="Tape and Reel", Pricing 1="1=2,08000, 10=1,92800, 50=1,75300, 100=1,59400, 500=1,44900 (USD)", RoHS=Yes, Shielding=Shielded, Stock 1=995, Supplier 1=Digi-Key, Width=0.335inch
L13 L17: Inductance [µH]=8.2, Part Number=CDRH5D28NP-8R2, Supplier 2=Digi-Key, Supplier Part Number 2=308-2309-6-ND
L15: library part Inductor, Manufacturer=TDK, Manufacturer Part Number=MLZ1608N6R8LT000, Supplier Part Number 1=445-MLZ1608N6R8LT000CT-ND, Pricing 1="1 = 0,17000, 10 = 0,15500, 100 = 0,10350, 500 = 0,08626, 1000 = 0,07245 (USD)", Stock 1=3883, Supplier 1=Digi-Key
L16: Inductance="4.2 µH", Supplier Part Number 1=308-1802-1-ND, Supplier 1=Digi-Key
L18: "Fixed Inductors 3.3uH 1.57A 30% SMD LP INDUCTOR", Case/Package=Nonstandard, Current Rating=1.57A, DC Resistance (DCR)=49.2mR, Inductance=3.3uH, Manufacturer=Sumida, Max Operating Temperature=100°C, Min Operating Temperature=-40°C, Package Quantity=2000, Supplier Part Number 1=308-2184-1-ND, Test Frequency=100kHz, Tolerance=30%, ComponentLink1Description=http://www.mouser.com/ds/2/390/CDRH4D28-515415.pdf?src-supplier=Mouser, ComponentLink1URL=http://www.mouser.com/ds/2/390/CDRH4D28-515415.pdf?src-supplier=Mouser, ComponentLink2Description=http://www.sumida.com/products/pdf/CDRH4D28,CDRH4D28C,CDRH4D28CLD.pdf?src-supplier=Digi-Key, ComponentLink2URL=http://www.sumida.com/products/pdf/CDRH4D28,CDRH4D28C,CDRH4D28CLD.pdf?src-supplier=Digi-Key, ComponentLink3Description=http://www.sumida.com/products/pdf/CDRH4D28.pdf?src-supplier=Future+Electronics, ComponentLink3URL=http://www.sumida.com/products/pdf/CDRH4D28.pdf?src-supplier=Future+Electronics, ComponentLink4Description=http://products.sumida.com/products/pdf/CDRH4D28.pdf?src-supplier=Digi-Key, ComponentLink4URL=http://products.sumida.com/products/pdf/CDRH4D28.pdf?src-supplier=Digi-Key, ComponentLink5Description=http://www.sumida.com/products/pdf/CDRH4D28.pdf?src-supplier=Avnet, ComponentLink5URL=http://www.sumida.com/products/pdf/CDRH4D28.pdf?src-supplier=Avnet, Core Material=Ferrite, Depth=5mm, Height=3mm, Height - Seated (Max)=0.118inch, Lead Free="Lead Free", Length=0.185inch, Manufacturer Part Number=CDRH4D28NP-3R3NC, Max DC Current=1.57A, Mount="Surface Mount", Packaging="Tape and Reel", Pricing 1="1 = 0,93000, 10 = 0,86000, 100 = 0,62160, 500 = 0,47610, 1000 = 0,42320 (USD)", Radiation Hardening=No, RoHS=Yes, Shielding=Shielded, Stock 1=33311, Supplier 1=Digi-Key, Termination=SMD/SMT, Weight=0.007055oz, Width=0.197inch
L19: library part 7843330330, "WE-CHSA SMT High Current Inductor, size 1011, 3.3uH, 13.8A", DC Resistance max.=6.5mOhm, Inductance=3.3uH, Operating Temperature="-55 to +150degC", Rated Current=13.8A, Saturation Current=20.5A, Self Resonant Frequency=55MHz, ComponentLink1Description=Manufacturer, ComponentLink1URL=http://www.we-online.de, ComponentLink2Description=Datasheet, ComponentLink2URL=https://katalog.we-online.com/am/datasheet/7843330330.pdf, Mounting Technology=SMT, Packaging="Tape and Reel", Part Number=7843330330, Published Date="June 2019", Publisher="Wurth Elektronik", Size=1011
L20: library part 7443340150, "SMT High Current Cube Inductor WE-HCC, size 8070, 1.5 uH, 16.5 A", DC Resistance max.="5.6 mOhm", Inductance="1.5 uH", Operating Temperature="-40 to +125 degC", Rated Current="16.5 A", Saturation Current="18.5 A", Self Resonant Frequency="120 MHz", ComponentLink1Description=Manufacturer, ComponentLink1URL=http://www.we-online.de, ComponentLink2Description=Datasheet, ComponentLink2URL=https://katalog.we-online.com/pbs/datasheet/7443340150.pdf, Material=Ferrite, Mounting Technology=SMT, Packaging="Tape and Reel", Part Number=7443340150, Published Date="December 2018", Publisher="Wurth Elektronik", Size=8070
L22: "Inductor Power Shielded Wirewound 22uH 20% 100KHz 20Q-Factor Carbonyl Powder 9A 37mOhm DCR Automotive T/R", Case/Package=Nonstandard, Current Rating=9A, DC Resistance (DCR)=37mR, Inductance=22uH, Inductance Tolerance=20%, Manufacturer=Bourns, Max Operating Temperature=150°C, Min Operating Temperature=-40°C, Ratings=AEC-Q200, Saturation Current=12A, Self Resonant Frequency=6MHz, Supplier Part Number 1=SRP1265A-220MCT-ND, Test Frequency=100kHz, ComponentLink1Description=https://datasheet.ciiva.com/48685/srp1265a-48685099.pdf?src-supplier=Avnet, ComponentLink1URL=https://datasheet.ciiva.com/48685/srp1265a-48685099.pdf?src-supplier=Avnet, ComponentLink2Description=https://datasheet.ciiva.com/48685/srp1265a-48685101.pdf?src-supplier=Avnet, ComponentLink2URL=https://datasheet.ciiva.com/48685/srp1265a-48685101.pdf?src-supplier=Avnet, Composition=Wirewound, Core Material="Carbonyl Powder", DC Current=9A, Depth=12.8mm, Height=6.2mm, Height - Seated (Max)=0.252inch, Length=0.531inch, Manufacturer Part Number=SRP1265A-220M, Max DC Current=9A, Military Standard=Not, Mount="Surface Mount", Packaging="Cut Tape", Pricing 1="1 = 2,06000, 10 = 1,89800, 100 = 1,32830 (USD)", REACH SVHC="No SVHC", RMS Current (Irms)=9A, RoHS=Yes, Shielding=Shielded, Stock 1=17828, Supplier 1=Digi-Key, Termination=SMD/SMT, Tolerance=20%, Width=0.492inch
MP1_PCIE0 MP1_PCIE1 MP1_PCIE2 MP1_PCIE3 MP1_PCIE4 MP2_PCIE0 MP2_PCIE1 MP2_PCIE2 MP2_PCIE3 MP2_PCIE4 MP3_PCIE0 MP3_PCIE1 MP3_PCIE2 MP3_PCIE3 MP3_PCIE4: library part 9774025243R, "WA-SMSI SMT Steel Spacer, OD4.35mm, M2x2.5mm", Operating Temperature="-55 to +150degC", ComponentLink1Description=Manufacturer, ComponentLink1URL=http://www.we-online.de, ComponentLink2Description=Datasheet, ComponentLink2URL=https://katalog.we-online.com/em/datasheet/9774025243R.pdf, Inner Diameter=2.8mm, Inner Thread Length=-, Length=2.5mm, Material=Steel, Mounting Technology=SMT, Outer Diameter=4.35mm, Packaging="Tape and Reel", Part Number=9774025243R, Published Date="September 2019", Publisher="Wurth Elektronik", Surface=Tin, Thread=M2
P1 P13: "Header, 3-Pin", LatestRevisionDate=17-Jul-2002, LatestRevisionNote="Re-released for DXP Platform.", Publisher="Altium Limited"
P2: "Header, 4-Pin", LatestRevisionDate=17-Jul-2002, LatestRevisionNote="Re-released for DXP Platform.", Publisher="Altium Limited"
P3 P4 P5 P11: "Header, 2-Pin", LatestRevisionDate=17-Jul-2002, LatestRevisionNote="Re-released for DXP Platform.", Publisher="Altium Limited"
P6: "Male Header, Pitch 2.54 mm, 1 x 2 Position, Height 10.49 mm, Tail Length 3.556 mm, -55 to 105 degC, RoHS, Bulk", Color=White, Current, Rating="5  A", Flammability Rating=UL94V-0, Supplier Part Number 1=A1921-ND, Temperature, Operating="-55 to +105  °C", Voltage, Rating="250  V", Agency Approvals="CSA, UL", Angle=Straight, Brand/Series="MTA-100 Series", Color, Housing=White, ComponentLink1Description="Manufacturer URL", ComponentLink1URL=http://www.te.com, ComponentLink2Description=Datasheet, ComponentLink2URL=https://datasheet.ciiva.com/11746/0900766b80eb7fdd-11746365.pdf, Connector Type=MTA-100, Contact Centerline Spacing="0.100  in.", Contact Mating Area Plating=Tin, Contact Plating=Tin, Contact Shape=Square, Contact Termination Area Plating=Tin, DatasheetVersion="Rev. W", Length, Overall="0.2  \"", Length, Pin="0.14  \"", Length, Terminal Post="0.14  in.", Material, Contact="Copper Alloy", Material, Housing=Polyester, Mount Angle=Vertical, Mounting Hole Size="0.04  \"", Mounting Type="PC Mount", Number of Contacts=2, Number of Positions=2, Number of Rows=1, PackageDescription="HDR, 2-Leads, Body 5.715x5.08mm, Pitch 2.54mm", PackageReference=THD, Pin Spacing="0.1  \"", Primary Type="Interconnect System", Size, Post="0.025  in.", Special Features=Pinstrip, Standards="RoHS Compliant, ELV Compliant, UL 94V-0", Supplier 1=Digi-Key, Termination=Solder, Type="PCB Plug"
P12: "Header, 7-Pin, Dual row", LatestRevisionDate=17-Jul-2002, LatestRevisionNote="Re-released for DXP Platform.", Publisher="Altium Limited"
R1 R2 R127 R130 R131 R132 R133 R134 R139 R345 R376 R377 R378 R402 R403 R404 R405 R406 R407 R408 R409 R411 R412 R413 R414 R415 R416 R418 R421 R498 R636 R637 R638 R639 R640 R641 R642 R643 R692 R722 R723 R724 R725 R726 R727 R728 R729 R912 R1001 R1004 R1005 R1006 R1007 R1008 R1009 R1010 R1011 R1012 R1013 R1014 R1015 R1016 R1017 R1018 R1019 R1020 R1021 R1022 R1023 R1024 R1025 R1026 R1027 R1028 R1029 R1030 R1031 R1032 R1033 R1034 R1035 R1036 R1037 R1038 R1039 R1040 R1041 R1042 R1043 R1044 R1045 R1046 R1047: library part Resistor, "SMT Resistor", Case/Package=0402, Case Code (Metric)=1005, Manufacturer=Vishay, Manufacturer Part Number=CRCW04020000Z0ED, Max Operating Temperature=155°C, Max Power Dissipation=63mW, Min Operating Temperature=-55°C, Package Quantity=1, Resistance=0mR, Supplier Part Number 1=541-0.0JCT-ND, Temperature Coefficient=100ppm/°C, Tolerance=5%, Voltage Rating=50V, Case Code (Imperial)=0402, ComponentLink1Description=https://datasheet.ciiva.com/16881/dcrcwe3-16881413.pdf?src-supplier=Avnet+Europe, ComponentLink1URL=https://datasheet.ciiva.com/16881/dcrcwe3-16881413.pdf?src-supplier=Avnet+Europe, ComponentLink2Description=https://datasheet.ciiva.com/2461/dcrcwe3-2461964.pdf?src-supplier=Digi-Key, ComponentLink2URL=https://datasheet.ciiva.com/2461/dcrcwe3-2461964.pdf?src-supplier=Digi-Key, ComponentLink3Description=https://datasheet.ciiva.com/7841/1697337-7841468.pdf?src-supplier=Element14, ComponentLink3URL=https://datasheet.ciiva.com/7841/1697337-7841468.pdf?src-supplier=Element14, ComponentLink4Description=https://datasheet.ciiva.com/3255/dcrcwe3-3255944.pdf?src-supplier=Avnet, ComponentLink4URL=https://datasheet.ciiva.com/3255/dcrcwe3-3255944.pdf?src-supplier=Avnet, ComponentLink5Description=https://datasheet.ciiva.com/3255/dcrcwe3-3255945.pdf?src-supplier=Avnet, ComponentLink5URL=https://datasheet.ciiva.com/3255/dcrcwe3-3255945.pdf?src-supplier=Avnet, ComponentLink6Description=https://datasheet.ciiva.com/2461/dcrcwe3-2461962.pdf?src-supplier=Digi-Key, ComponentLink6URL=https://datasheet.ciiva.com/2461/dcrcwe3-2461962.pdf?src-supplier=Digi-Key, ComponentLink7Description=https://datasheet.ciiva.com/7841/1720486-7841802.pdf?src-supplier=Element14, ComponentLink7URL=https://datasheet.ciiva.com/7841/1720486-7841802.pdf?src-supplier=Element14, ComponentLink8Description=https://datasheet.ciiva.com/2461/dcrcwe3-2461963.pdf?src-supplier=Digi-Key, ComponentLink8URL=https://datasheet.ciiva.com/2461/dcrcwe3-2461963.pdf?src-supplier=Digi-Key, ComponentLink9Description=https://datasheet.ciiva.com/16761/70200976-16761309.pdf?src-supplier=Allied+Electronics, ComponentLink9URL=https://datasheet.ciiva.com/16761/70200976-16761309.pdf?src-supplier=Allied+Electronics, ComponentLink10Description=https://datasheet.ciiva.com/26311/fld-crcw-e3-data-en-26311550.pdf?src-supplier=Distrelec, ComponentLink10URL=https://datasheet.ciiva.com/26311/fld-crcw-e3-data-en-26311550.pdf?src-supplier=Distrelec, Composition="Thick Film", Contact Plating=Tin, Depth=0.5mm, Features="Automotive AEC-Q200", Height=0.35mm, Lead Free="Lead Free", Length=1mm, Military Standard=Not, Mount="Surface Mount", Number of Terminations=2, Packaging="Tape and Reel", Power Rating=63mW, Pricing 1="1 = 0,10000, 10 = 0,03400, 25 = 0,02440, 50 = 0,01860, 100 = 0,01380, 250 = 0,01048, 500 = 0,00840, 1000 = 0,00618, 5000 = 0,00443 (USD)", Radiation Hardening=No, REACH SVHC=Unknown, RoHS=Yes, Stock 1=1906658, Supplier 1=Digi-Key, Termination=SMD/SMT, Voltage Rating (DC)=50V, Weight=2.3E-05oz, Width=0.5mm
R3_I2C_Bridge_GPIO R4_I2C_Bridge_GPIO R5_I2C_Bridge_GPIO R6_I2C_Bridge_GPIO R7_I2C_Bridge_GPIO R8_I2C_Bridge_GPIO R9_I2C_Bridge_GPIO R10_I2C_Bridge_GPIO R60 R223_I2C_Bridge_GPIO R224_I2C_Bridge_GPIO R225_I2C_Bridge_GPIO R226_I2C_Bridge_GPIO R227_I2C_Bridge_GPIO R231_SPI_bridge_PCIe R233_SPI_bridge_PCIe R236_SPI_bridge_PCIe R238_SPI_bridge_PCIe R240_SPI_bridge_PCIe R252 R253 R254 R255 R424 R427 R428 R488 R538 R558_I2C_Bridge_GPIO R559_I2C_Bridge_GPIO R560_I2C_Bridge_GPIO R599 R694 R1048 R1049 R1050 R1051 R1052 R1053: library part Resistor, Case/Package=0402, Case Code (Metric)=1005, Manufacturer=Panasonic, Manufacturer Part Number=ERJ-2RKF1001X, Max Operating Temperature=155°C, Max Power Dissipation=100mW, Min Operating Temperature=-55°C, Package Quantity=1, Supplier Part Number 1=P1.00KLCT-ND, Temperature Coefficient=100ppm/°C, Tolerance=1%, Voltage Rating=50V, Case Code (Imperial)=0402, ComponentLink1Description=https://datasheet.ciiva.com/11821/0900766b80f80784-11821203.pdf?src-supplier=RSComponents, ComponentLink1URL=https://datasheet.ciiva.com/11821/0900766b80f80784-11821203.pdf?src-supplier=RSComponents, Composition="Thick Film", Contact Plating=Tin, Depth=0.5mm, Features="Automotive AEC-Q200", Height=0.35mm, Lead Free="Lead Free", Length=1mm, Military Standard=Not, Mount="Surface Mount", Number of Pins=2, Number of Terminations=2, Packaging="Tape and Reel", Power Rating=100mW, Radiation Hardening=No, REACH SVHC="No SVHC", Resistance=1kR, RoHS=Yes, Supplier 1=Digi-Key, Termination=SMD/SMT, Voltage Rating (DC)=50V, Width=0.5mm, Working Voltage=50V